# Altium PCB Saleem_PCB.PcbDoc (part 3 of 3)
Units mil, origin at the board's own origin, x right, y up, seen from the top; angles counter-clockwise.
Board outline 2705.54 x 1767 mil, 2 copper layers (Top Layer, Bottom Layer); 91 components, 66 nets, 321 pads, 111 vias.
Unrouted connection lines stored in the file: 1.
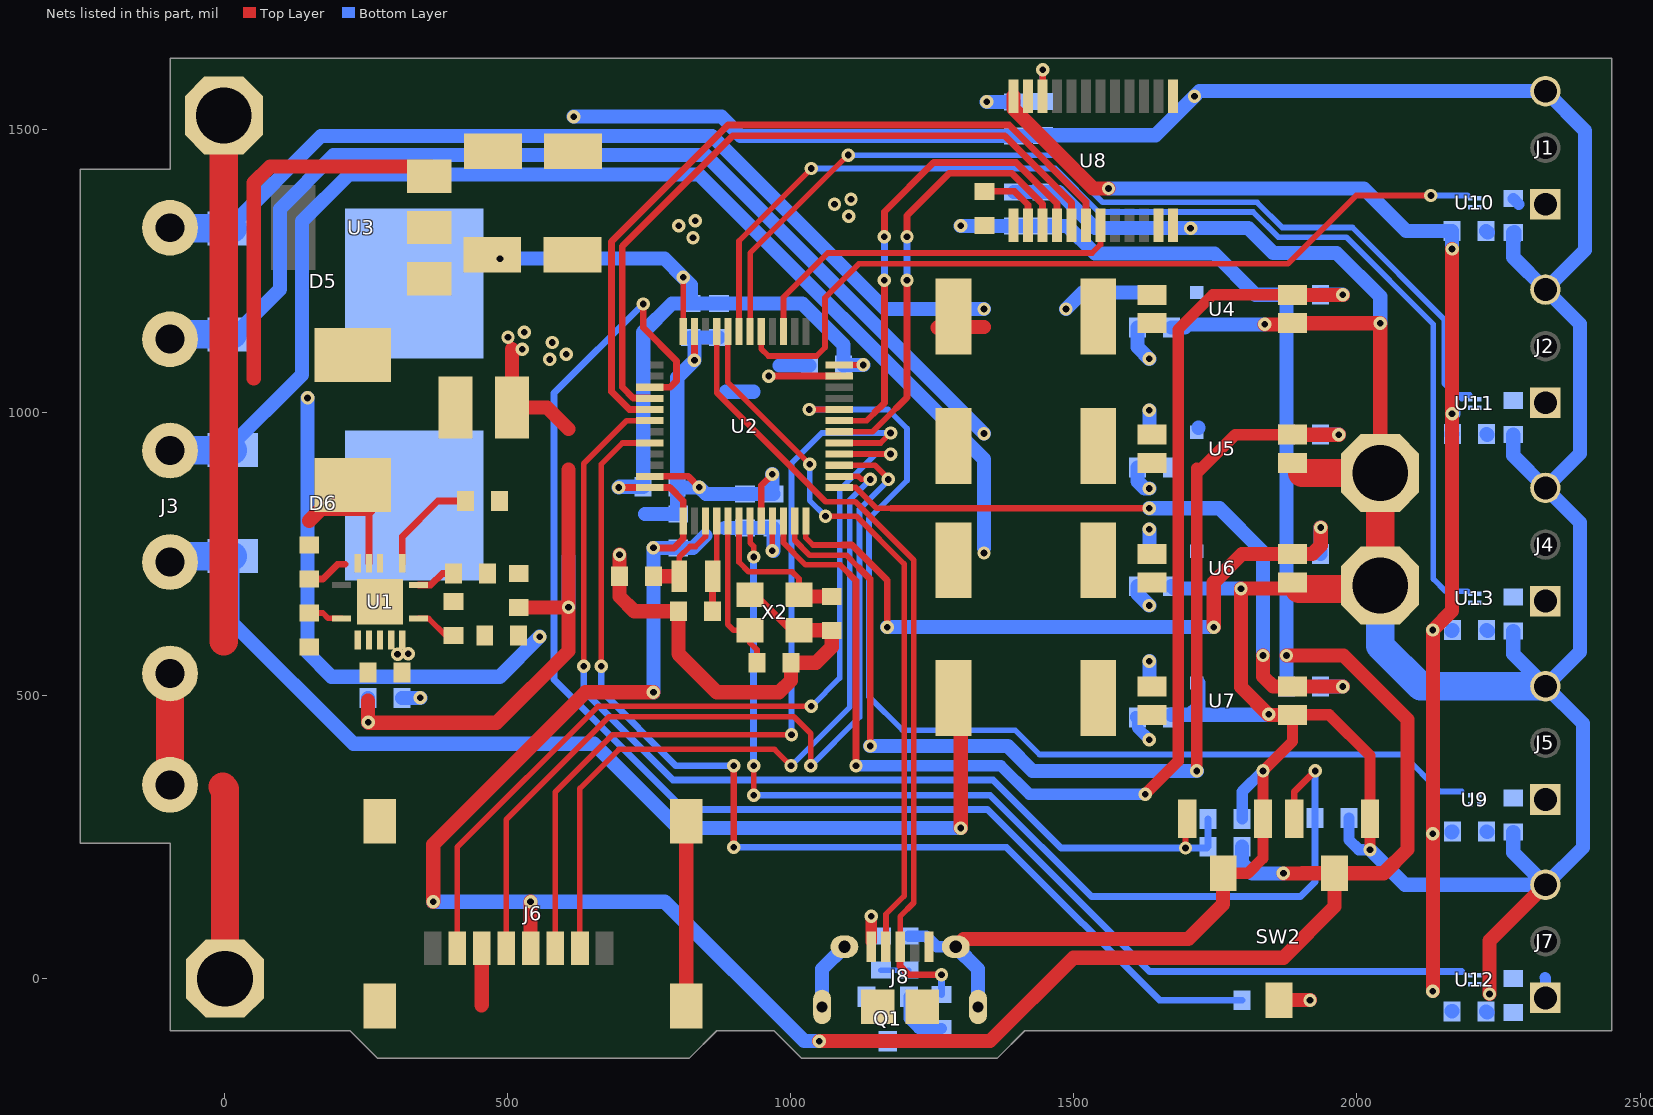
[diagram p2: the nets of this part, all layers, seen from the top]

## Via types
v1: diameter 23.62, hole 11.81, Top Layer to Bottom Layer, 111 vias

## Nets (pads, with @x,y where several pads share a name; then routed paths per layer and width w, separated by ;. In a path a pad name is that pad's centre, name@x,y a point inside that pad or via, vN(x,y) a via of type N, cw(c..) or ccw(c..) an arc to the next point about the centre after c; other vN are vias at no path point) (continued)
AN_1: D1.2 R7.1 U4.1 | length 185.1
  Top Layer w25: R7.1@1557.97,1150.27 R7.1@1557.97,1175.03
  Bottom Layer w25: v1(1486,1183) 1515.27,1212.27 D1.2@1634.17,1212.27
AN_2: D2.2 R12.1 U5.1 | length 38.5
  Bottom Layer w25: D2.2@1633.22,965.27 v1@1633.22,1003.78
  other v1: 1633,1004
AN_3: D3.2 R13.1 U6.1 | length 38.5
  Bottom Layer w25: D3.2@1633.22,755.27 v1@1633.22,793.78
  other v1: 1633,794
AN_4: D4.2 R14.1 U7.1 | length 38.5
  Bottom Layer w25: D4.2@1633.22,522.27 v1@1633.22,560.78
  other v1: 1633,561
BOOT0: R4.1 U2.44 | length 1944.7
  Top Layer w10: v1(665,552) 665,909 702.47,946.47 U2.44@750.68,946.47
  Top Layer w12: v1(899,232) v1(899,376)
  Bottom Layer w12: v1(665,552) 665,508 797,376 v1(899,376) ; v1(899,232) 1381,232 1651,-38 R4.1@1797,-38
BUTTON_1: D5.3 J3.1 R7.2 | length 1825.5
  Top Layer w25: R7.2@1259.05,1150.27 1259.32,1150 1260.32,1151 1341,1151
  Bottom Layer w25: J3.1@-97,1326.63 7.63,1326.63 170,1489 860.25,1489 1166.25,1183 v1(1341,1183)
  Bottom Layer w50: J3.1@-97,1326.63 -96.07,1325.7 D5.3@13.67,1325.7
BUTTON_2: D5.1 J3.2 R12.2 | length 1973.9
  Bottom Layer w25: J3.2@-97,1129.78 8.78,1129.78 97,1218 97,1360 192,1455 849,1455 v1(1341,963)
  Bottom Layer w50: J3.2@-97,1129.78 -88.48,1138.3 D5.1@13.67,1138.3
BUTTON_3: D6.3 J3.3 R13.2 | length 2275.1
  Bottom Layer w25: J3.3@-97,932.93 1.93,932.93 2.7,933.7 136,1067 136,1338 219,1421 837.75,1421 1341,917.75 v1@1341,761
  Bottom Layer w50: J3.3@-97,932.93 -96.22,933.7 2.7,933.7 D6.3@13.67,933.7
  other v1: 1341,752
BUTTON_4: D6.1 J3.4 R14.2 | length 1933.6
  Top Layer w25: v1(1300,266) R14.2@1300.05,530.27
  Bottom Layer w25: D6.1@13.67,746.3 13.67,628.33 227,415 652,415 801,266 v1(1300,266)
  Bottom Layer w50: J3.4@-97,736.07 -86.78,746.3 D6.1@13.67,746.3
Cath_1: R15.2 U4.2 | length 63.9
  Bottom Layer w25: R15.2@1612.3,1150.27 1612.3,1115.7 v1(1633,1095)
Cath_2: R16.2 U5.2 | length 50.5
  Bottom Layer w25: R16.2@1612.3,903.27 1612.3,878.7 1624.98,866.02 v1(1633,866.02)
Cath_3: R17.2 U6.2 | length 42.6
  Bottom Layer w25: R17.2@1612.3,693.27 1612.3,679.97 v1(1633,659.27)
Cath_4: R18.2 U7.2 | length 49.3
  Bottom Layer w20: R18.2@1609,461.27 R18.2@1609,463 ; R18.2@1612.3,461.27 1612.3,442.97 v1(1633,422.27)
GND: C1.2 C2.2 C3.2 C4.2 C6.2 C7.2 C8.2 C9.2 C10.2 C11.2 C12.2 C13.2 C14.2 C15.2 C16.2 C17.2 C18.2 C19.2 C20.1 C21.1 C22.1 C23.1 C24.2 C25.2 C26.2 C27.2 C28.2 C29.2 C30.2 C31.2 C32.2 C33.2 C34.2 D1.1 D2.1 D3.1 D4.1 J1.3 J2.3 J3.5 J3.6 J4.3 J5.3 J6.6 J6.MP1 J6.MP2 J6.MP3 J6.MP4 J7.3 J8.5 J8.MH1 J8.MH2 J8.MH3 J8.MH4 J8.MP1 J8.MP2 pad.MH R2.2 R5.2 R15.1 R16.1 R17.1 R18.1 R20.2 R21.2 SW1.2 SW2.3 SW3.2 U1.2 U1.3 U1.15 U2.8 U2.23 U2.35 U2.47 U3.1 U4.3 U5.3 U6.3 U7.3 U8.11 U8.12 U8.13 U9.2 U10.2 U11.2 U12.2 U13.2 X2.2 X2.4 | length 14261.8
  Top Layer w12: U2.47@750.68,887.42 818.58,887.42 v1(838,868) ; v1(829.42,1092.58) U2.35@829.42,1143.32 ; X2.4@935.69,679.5 X2.2@998.68,616.5 ; U2.8@947.53,808.68 947.53,871.53 v1(967,891) ; v1(961,1064.58) U2.23@1085.32,1064.58
  Top Layer w20: SW2.3@1763.57,186.2 1807.2,186.2 1833.93,212.93 SW3.2@1833.93,282.75 v1(1833.93,367) 1886.02,419.09 U7.3@1886.02,466 1951,466 2023,394 v1@2023,229 ; U6.3@1886.02,700 U6.3@1897.52,688.5 ; U5.3@1886.02,911 U5.3@1903.52,893.5
  Top Layer w25: 253,491 v1(253,453) 254,452 480,452 607,579 v1(607,656) ; 453,-47 453.77,-46.23 J6.6@453.77,54 ; 507,1112 C2.2@507,1009 569,1009 607,971 ; C3.2@519,656 v1(607,656) ; 607,899 v1(607,656) ; v1(697,749) C20.1@697,711 697,675 723,649 C21.1@801,649 801,574 869,506 979,506 1000,527 C22.1@1000,558 1044,558 1072,586 C23.1@1072,615 ; J6.MP1@814.99,-48.36 J6.MP3@814.99,278.41 ; X2.2@1014.31,615.5 C23.1@1071.5,615.5 ; J8.MH2@1291.22,56.3 1304.92,70 1702,70 1763.57,131.57 SW2.3@1763.57,186.2 ; v1(1837,1156) 1884,1156 U4.3@1885,1157 ; U7.3@1886.02,466 1844.02,466 1795,515.02 v1(1795,689) 1875.02,689 U6.3@1886.02,700 ; U4.3@1886.02,1158 v1(2041,1158) pad.MH@2041,922.5 ; v1(2234,-27) 2234,67 J7.3@2333,166
  Top Layer w50: J3.6@-97,342.37 J3.5@-97,539.22 ; -4,339 0,335 pad.MH@0,0 ; -2,596 pad.MH@-2,1525 ; U6.3@1897.52,688.5 pad.MH@2041,688.5 ; U5.3@1903.52,893.5 pad.MH@2041,893.5 pad.MH@2041,699.5
  Bottom Layer w20: R21.2@1208,75 1239,75 1257.7,56.3 J8.MH2@1291.22,56.3 ; D4.1@1718.8,522.27 1719.07,522 D4.1@1719.8,522 ; C34.2@1797,282.25 1797,330.07 v1(1833.93,367) ; C18.2@1986.02,283.75 1986.02,244.98 2003.05,227.95 v1@2022.05,227.95
  Bottom Layer w25: v1(253,453) C1.2@253,496 ; v1(607,656) 607,745 ; v1(616,1523) 877,1523 911,1489 C12.2@1394,1489 1444,1489 R20.2@1445,1490 1644,1490 v1(1713,1559) 1722,1568 J1.3@2333,1568 2403,1498 2403,1287.5 J2.3@2333,1217.5 ; 742,821 C6.2@801,821 799,823 C7.2@799,869 ; C15.2@873,1133 C13.2@823,1133 829.42,1126.58 v1(829.42,1092.58) 799,1062.17 C7.2@799,869 ; 885,1037 934,1037 ; v1(967,891) 967,858 C14.2@969,856 C16.2@919,856 850,856 v1(838,868) 800,868 C7.2@799,869 ; 980,1083 C17.2@1033,1083 ; J8.MH3@1055,-50 1055,16.93 J8.MH1@1094.37,56.3 ; J8.MH2@1291.22,56.3 1330.59,16.93 J8.MH4@1330.59,-50 ; C10.2@1394,1390 C11.2@1444,1390 1473.35,1390 1537.35,1326 v1(1706,1326) 1808,1326 1852,1282 1964,1282 2041,1205 v1(2041,1158) ; R18.1@1672.3,466.27 1705.27,466.27 ; R17.1@1672.3,693.27 1676.57,689 v1(1795,689) ; R15.1@1672.3,1150.27 1695.73,1150.27 ; 1710,1156 v1(1837,1156) ; D4.1@1718.8,522.27 D4.1@1719.8,522.27 ; D4.1@1719.8,522 1719.8,480.8 1705.27,466.27 ; v1(1844.02,466.98) 1843.31,466.27 1705.27,466.27 ; v1(2022.95,227.95) 2084.89,166 J7.3@2333,166 ; C32.2@2228,-58 C32.2@2230,-60 ; C24.2@2228,1321 C24.2@2231,1318 ; C30.2@2229,260 C30.2@2230,259 ; C28.2@2229,616 C28.2@2231,614 ; C26.2@2229,962 C26.2@2230,961 ; C31.2@2276,259 2276,223 J7.3@2333,166 ; C29.2@2276,614 2276,573.5 J5.3@2333,516.5 ; C27.2@2276,961 2276,924 J4.3@2333,867 ; C25.2@2276,1318 2276,1274.5 J2.3@2333,1217.5 ; C25.2@2278,1307 C25.2@2278,1319 ; J7.3@2333,166 2399,232 2399,450.5 J5.3@2333,516.5 ; J5.3@2333,516.5 2394,577.5 2394,806 J4.3@2333,867 ; J4.3@2333,867 2394,928 2394,1156.5 J2.3@2333,1217.5
  Bottom Layer w50: pad.MH@2041,694.5 2041,588 2112.5,516.5 J5.3@2333,516.5
  other v1: 574,1094 603,1103 525,1112 578,1124 500,1133 529,1142 827,1309 802,1330 831,1339 1102,1347 1077,1368 1106,1377
LED_EN1: U2.29 U10.4 | length 1452.8
  Top Layer w10: U2.29@947.53,1143.32 947.53,1112.47 960,1100 1045,1100 1060,1115 1060,1203 1120,1263 1878,1263 1998.6,1383.6 v1(2130.6,1383.6)
  Bottom Layer w10: v1(2130.6,1383.6) 2195.28,1383.6
LED_EN2: U2.30 U11.4 | length 1729.6
  Top Layer w10: U2.30@927.84,1143.32 927.84,1281.84 v1(1101,1455)
  Bottom Layer w10: v1(1101,1455) 1467.35,1455 1550.85,1371.5 1823.5,1371.5 1868,1327 1992,1327 2154,1165 2154,1052 2175,1031 2185.04,1031 ; 2185.04,1024.58 2185.04,1031 ; 2199,1031 2185.04,1031
LED_EN3: U2.31 U13.4 | length 2073
  Top Layer w10: U2.31@908.16,1143.32 908.16,1303.35 v1(1036,1431.19)
  Bottom Layer w10: v1(1036,1431.19) 1466.81,1431.19 1543.5,1354.5 1816.46,1354.5 1860.96,1310 1981,1310 2135,1156 2135,706 2156.53,684.47 2187.01,684.47 2195.28,684.47
LED_EN4: U2.20 U9.4 | length 1857.2
  Top Layer w10: v1(1032.53,1005.53) U2.20@1085.32,1005.53
  Bottom Layer w10: v1(1032.53,1005.53) 1171.47,1005.53 1205,972 1205,880 1138,813 1138,498 1197,439 1396,439 1439,396 2081,396 2146.31,330.69 2185.04,330.69
LED_EN5: U2.39 U12.4 | length 2758.3
  Top Layer w12: v1(739,1192) 739,1150 798,1091 798,1056 786.9,1044.9 U2.39@750.68,1044.9
  Bottom Layer w12: v1(739,1192) 581.5,1034.5 581.5,528.5 811,299 1347,299 1633.31,12.69 2185.04,12.69
LED_IN1: C25.1 J1.1 U10.1 | length 14.1
  Bottom Layer w20: C25.1@2276,1378 C25.1@2286,1368
LED_IN2: C27.1 J2.1 U11.1
LED_IN3: C29.1 J4.1 U13.1
LED_IN4: C31.1 J5.1 U9.1
LED_IN5: C33.1 J7.1 U12.1 | length 36.4
  Bottom Layer w20: 2332,2 2333,1 J7.1@2333,-34
MCU_IN1: R8.1 U2.10 U4.4 | length 2253.7
  Top Layer w10: U2.10@986.9,808.68 986.9,770.06 1025.96,731 1087,731 1103.5,714.5
  Top Layer w12: 1103.5,714.5 1115,703 v1(1115,376)
  Top Layer w20: v1(1626,326) 1684,384 1684,1147 1745,1208 U4.4@1886.02,1208
  Top Layer w25: U4.4@1886.02,1208 v1(1975,1208)
  Bottom Layer w20: v1(1115,376) 1371,376 1421,326 v1(1626,326)
  Bottom Layer w25: R8.1@1935.51,1208.27 v1@1974.73,1208.27
MCU_IN2: R9.1 U2.11 U5.4 | length 1932.9
  Top Layer w10: U2.11@1006.58,808.68 1006.58,774.42 1033,748 1098,748 1120.5,725.5
  Top Layer w12: 1120.5,725.5 1140,706 v1(1140,411)
  Top Layer w20: v1(1717,367) 1717,902 ; 1717,893 1785,961 U5.4@1886.02,961
  Top Layer w25: U5.4@1886.02,961 v1(1968,961)
  Bottom Layer w25: v1(1140,411) 1383,411 1427,367 v1(1717,367) ; R9.1@1935.51,961.27 v1@1968,961.27
MCU_IN3: R10.1 U2.12 U6.4 | length 1238.3
  Top Layer w10: U2.12@1026.27,808.68 1026.27,778.77 1039.04,766 1091,766
  Top Layer w12: 1091,766 1108,766 1170,704 v1(1170,621)
  Top Layer w25: v1(1747,621) 1747,700 1797,750 U6.4@1886.02,750 1921,750 1936,765 v1(1936,797)
  Bottom Layer w25: v1(1170,621) v1(1747,621) ; R10.1@1935.51,750.27 v1@1935.51,797
MCU_IN4: R11.1 U2.13 U7.4 | length 1201.8
  Top Layer w10: U2.13@1085.32,867.73 1114.34,867.73 1151.07,831 1177,831
  Top Layer w12: 1177,831 v1@1632,831
  Top Layer w25: v1(1834,571) 1834,534 1852,516 U7.4@1886.02,516 ; U7.4@1887.02,516 v1(1975,516)
  Bottom Layer w25: v1(1633,831) 1757,831 1834,754 v1(1834,571) ; R11.1@1935.51,516.27 1974.73,516.27 v1(1975,516)
NetC3_1: C3.1 R1.1
NetC4_1: C4.1 U1.9 | length 185
  Top Layer w12: U1.9@313.37,733.91 313.37,781.37 376,844 C4.1@425,844
NetC5_2: C5.2 U1.13 | length 73.8
  Top Layer w12: C5.2@149,706 173,706 199,732 212,732
NetQ1_1: Q1.1 R6.1 R21.1 | length 49
  Bottom Layer w10: R6.1@1159,15 R21.1@1208,15
NetQ1_2: Q1.2 R22.2 | length 103.7
  Bottom Layer w20: Q1.2@1208.4,-31.63 1208.4,-70.4 1226,-88 R22.2@1266,-88
NetR1_2: R1.2 U1.8 | length 70.6
  Top Layer w12: U1.8@341.91,695.53 363.53,695.53 384,716 R1.2@404,716
NetR2_1: R2.1 U1.1 | length 61
  Top Layer w10: R2.1@149,646 173,646 182.53,636.47 U1.1@206.09,636.47
NetR4_2: R4.2 SW2.2 | length 115.4
  Top Layer w25: SW2.2@1862,-37 1863,-38 v1(1917,-38)
  Bottom Layer w25: R4.2@1857,-38 v1(1917,-38)
NetR19_2: R19.2 U8.2 | length 123.1
  Top Layer w12: R19.2@1342,1391 1395.13,1391 1418.84,1367.29 U8.2@1418.84,1330.83
NetR20_1: R20.1 U8.22 | length 103.4
  Top Layer w12: U8.22@1445,1561 v1(1445,1606)
  Bottom Layer w12: v1(1445,1606) R20.1@1445,1550 1445,1549 R20.1@1446,1548
PB6: C34.1 R23.1 SW3.1 U2.42 | length 1871.4
  Top Layer w10: v1@634,553 634,910 709.84,985.84 U2.42@750.68,985.84 ; v1(1697,230.75) 1697,279.68 SW3.1@1700.07,282.75
  Bottom Layer w10: v1(634,552) v1@634,553 ; R23.1@1734.75,230.75 R23.1@1737,233
  Bottom Layer w12: v1(634,552) 634,508 791.25,350.75 1357.25,350.75 1477.25,230.75 v1(1697,230.75) R23.1@1734.75,230.75 ; R23.1@1737,233 C34.1@1737,282.25
PH: C5.1 L1.1 U1.11 U1.12 | length 210.2
  Top Layer w12: U1.12@254.32,733.91 L1.1@254.32,830.07
  Top Layer w25: 149,809 170.07,830.07 L1.1@254.32,830.07
PWM_1: U2.18 U8.3 | length 796.7
  Top Layer w10: U2.18@1085.32,966.16 1144.16,966.16 1186.5,1008.5
  Top Layer w12: 1186.5,1008.5 1205,1027 v1(1205,1234) ; v1(1205,1310.87) 1205,1348 1280,1423 1390,1423 1444.43,1368.57 U8.3@1444.43,1330.83
  Bottom Layer w12: v1(1205,1234) v1(1205,1310.87)
PWM_2: U2.19 U8.4 | length 840.5
  Top Layer w10: U2.19@1085.32,985.84 1133.84,985.84 1147,999
  Top Layer w12: 1147,999 1165,1017 v1(1165,1234) ; v1(1165,1310.87) 1165,1354.87 1252.13,1442 1397.87,1442 1470.02,1369.85 U8.4@1470.02,1330.83
  Bottom Layer w12: v1(1165,1234) v1(1165,1310.87)
PWM_3: U2.40 U8.5 | length 1269.5
  Top Layer w12: U2.40@750.68,1025.21 750.29,1025.6 721.28,1025.6 702,1044.88 702,1294 897,1489 1377.74,1489 1495.61,1371.13 U8.5@1495.61,1330.83
PWM_4: U2.41 U8.6 | length 1367
  Top Layer w12: U2.41@750.68,1005.53 714.48,1005.53 683,1037.01 683,1302 889,1508 1385.61,1508 1521.2,1372.41 U8.6@1521.2,1330.83
PWM_5: U2.27 U8.7 | length 693
  Top Layer w10: U2.27@986.9,1143.32 986.9,1203.9 1065,1282 1532,1282 1546.8,1296.8 U8.7@1546.8,1330.83
RST: C18.1 SW1.1 U2.7 | length 1864.3
  Top Layer w10: v1@927.84,746.16 v1@929,745 ; U2.7@927.84,808.68 927.84,770.16 934,764 v1(934,745) ; v1(934,324) v1(934,376) v1@934,379
  Top Layer w12: SW1.1@1889.09,282.75 1889.09,330.09 v1(1926,367)
  Bottom Layer w12: v1(934,324) 1352,324 1531,145 1900,145 1926,171 v1(1926,367) ; v1(934,376) v1(934,745)
SPI_CLK: J6.5 U2.15 | length 1570.6
  Top Layer w10: J6.5@497.08,54 497.08,281.08 679,463 1005,463 1035,433 v1(1035,376) ; U2.15@1085.32,907.1 1148.57,907.1 1172,883.67 v1(1172,882)
  Bottom Layer w10: v1(1035,376) 1121,462 1121,829.33 1172,880.33 v1(1172,882)
SPI_CS: J6.2 U2.14 | length 1316.5
  Top Layer w10: J6.2@627,54 627,336 696,405 971,405 v1(1000,376) ; U2.14@1085.32,887.42 1119,887.42 1124.42,882 v1(1140,882)
  Bottom Layer w10: v1(1000,376) 1104,480 1104,846 v1(1140,882)
SPI_MISO: J6.7 U2.16 | length 1516.8
  Top Layer w10: J6.7@410.46,54 410.46,232.46 659,481 v1(1036,481) ; U2.16@1085.32,926.79 v1(1176,926.79)
  Bottom Layer w10: v1(1036,481) 1086,531 1086,863 1149.79,926.79 v1(1176,926.79)
SPI_MOSI: J6.3 U2.17 | length 1509.7
  Top Layer w10: J6.3@583.69,54 583.69,329.69 685,431 v1(1001,431) ; U2.17@1085.32,946.47 1158.47,946.47 v1(1176,964)
  Bottom Layer w10: v1(1001,431) 1001,910.67 1054.33,964 v1(1176,964)
USB_DM: J8.2 U2.32 | length 1261.6
  Top Layer w10: U2.32@888.47,1143.32 888.47,1053.53 v1(1033,909) ; v1(1061,817) 1115.57,817 1200,732.57 1200,146 1168,114 1168,57.09 J8.2@1167.2,56.3
  Bottom Layer w10: v1(1033,909) 1033,845 v1(1061,817)
USB_DP: J8.3 R22.1 U2.33 | length 1420.7
  Top Layer w10: 868.79,1074.11 868.79,1035.21 1061.5,842.5 1114.11,842.5 1217,739.61 1217,134 1192.8,109.8 J8.3@1192.8,56.3 ; 868.81,1074.14 U2.33@868.79,1143.32
  Top Layer w12: J8.3@1192.8,56.3 1192.8,22.2 1208,7 v1(1266,7)
  Bottom Layer w12: R22.1@1266,-28 v1(1266,7)
VBAT: C1.1 C19.1 D5.4 D6.4 U1.4 U1.5 U1.6 | length 32
  Bottom Layer w25: C1.1@313,496 v1(345,496)
  other v1: 305,573 324,574
VBUS_5V: J8.1 R6.2 | length 44.7
  Top Layer w20: J8.1@1141.61,65.3 v1(1141.61,110)
VCC_3V3: C6.1 C7.1 C9.1 C10.1 C11.1 C13.1 C14.1 C15.1 C16.1 C17.1 J6.4 Q1.3 R8.2 R9.2 R10.2 R11.2 R19.1 R23.2 SW2.1 U2.1 U2.9 U2.24 U2.36 U2.48 U3.2 U8.1 | length 6916.4
  Top Layer w10: U2.36@809.73,1143.32 v1(809.73,1239) ; v1@967.21,756 U2.9@967.21,808.68 ; U2.24@1085.32,1084.27 v1(1127.73,1084.27)
  Top Layer w12: v1(695.73,867.73) U2.48@750.68,867.73 786.02,867.73 809.73,844.02 U2.1@809.73,808.68 809.73,777.73 793,761 v1(757,761)
  Top Layer w25: v1(368,136) 368,237 637,506 v1(757,506) ; v1(540,136) 540,54.39 J6.4@540.39,54 ; v1(1050,-110.37) 1351.63,-110.37 1499,37 1870,37 1960.43,127.43 SW2.1@1960.43,186.2 ; v1(1870,186) 1903,186 1903.2,186.2 SW2.1@1960.43,186.2 ; v1(1875.51,571) 1976,571 2089,458 2089,228 2047.2,186.2 SW2.1@1960.43,186.2
  Bottom Layer w25: v1(368,136) v1(540,136) 777,136 1023.37,-110.37 v1(1050,-110.37) Q1.3@1171,-110.37 ; v1(486,1272) 776.73,1272 v1(809.73,1239) 823,1225.73 C13.1@823,1193 ; v1(695.73,867.73) 697,869 C7.1@739,869 739,1142 790,1193 C13.1@823,1193 ; v1(757,506) v1(757,761) C6.1@801,761 827,761 849,783 ; 883,796 C16.1@919,796 C14.1@969,796 v1@969,756 ; v1(1127.73,1084.27) 1094.27,1084.27 C17.1@1093,1083 1093,1120 1020,1193 C15.1@873,1193 C13.1@823,1193 ; v1(1300,1330) C10.1@1394,1330 C11.1@1444,1330 1488.1,1330 1537.1,1281 1748,1281 1820.73,1208.27 R8.2@1875.51,1208.27 R9.2@1875.51,961.27 R10.2@1875.51,750.27 v1(1875.51,571) R11.2@1875.51,516.27 ; R23.2@1797,233 1797,204 1815,186 v1(1870,186)
  other v1: 967,756
VDD_5V: C2.1 C8.1 C12.1 C24.1 C26.1 C28.1 C30.1 C32.1 L1.2 R3.2 U3.3 U8.23 U8.24 U9.3 U10.3 U11.3 U12.3 U13.3 | length 3883.8
  Top Layer w25: 51,1060 51,1406 80,1435 U3.3@363,1435 ; U8.24@1393.25,1559.17 1393.25,1536.75 1534,1396 v1(1561,1396) ; v1(2134,-22) v1(2134,256) v1(2134,616) 2168,650 v1(2168,998) v1(2168,1289)
  Bottom Layer w25: v1(146,1026) 146,576 188.5,533.5 485.5,533.5 v1(556,604) ; v1(1346,1549) C12.1@1394,1549 ; v1(1561,1396) 2012,1396 2087,1321 C24.1@2168,1321 ; C32.1@2167.51,-57 2169,-57 C32.1@2168,-58 ; C30.1@2167.51,258.51 C30.1@2169,260 C30.1@2167.51,260 ; C28.1@2167.51,614.51 C28.1@2169,616 ; C26.1@2167.51,960.51 C26.1@2169,962 2168,963 C26.1@2167.51,963 ; C24.1@2167.51,1320.51 C24.1@2168,1321 ; v1(2168,1289) C24.1@2168,1321 ; v1@2170,998 v1@2170,1000
VSENSE: R3.1 R5.1 U1.7 | length 74.7
  Top Layer w10: U1.7@341.91,636.47 359.53,636.47 390,606 R5.1@404,606
X32_IN: C20.2 U2.3 X1.1 | length 168.3
  Top Layer w10: X1.1@802.47,711 802.47,744.47 821.49,763.49 831.51,763.49 849.1,781.08 U2.3@849.1,808.68
  Top Layer w25: C20.2@757,711 X1.1@802.47,711
X32_OUT: C21.2 U2.4 X1.2 | length 159.8
  Top Layer w10: X1.2@861.53,701 X1.2@861.79,701.26 ; X1.2@868.79,701.26 U2.4@868.79,808.68
  Top Layer w12: C21.2@861.53,649 X1.2@861.53,701
XIN: C22.2 U2.5 X2.1 | length 289.4
  Top Layer w10: U2.5@888.47,808.68 888.19,808.39 888.19,625.81 898.5,615.5 X2.1@927.69,615.5 927.69,593.31 940,581 C22.2@940,558
XOUT: C23.2 U2.6 X2.3 | length 268.4
  Top Layer w10: U2.6@908.16,808.68 908.16,735.84 925,719 1002,719 1014.31,706.69 X2.3@1014.31,678.5
  Top Layer w25: X2.3@1024.31,678.5 1027.8,675 C23.2@1072,675
pads on no net: J6.1 J6.8 J8.4 U1.10 U1.14 U2.2 U2.21 U2.22 U2.25 U2.26 U2.28 U2.34 U2.37 U2.38 U2.43 U2.45 U2.46 U3.4 U8.8 U8.9 U8.10 U8.14 U8.15 U8.16

## Polygon pours and split planes (outlines as drawn)
GND on Top Layer "GND_L01_P000" (hatched 45Degree grid 20 track 8, remove dead copper, pour order 0): -76,1591 2422,1591 2422,-68 1409,-68 1356,-121 1025,-121 972,-68 868,-68 815,-121 285,-121 238,-74 -76,-74 -76,267 -227,267 -227,1406 -76,1406
GND on Bottom Layer "GND_L02_P002" (hatched 45Degree grid 20 track 8, remove dead copper, pour order 2): -76,1599 2417,1599 2417,-60 1404,-60 1351,-113 1020,-113 967,-60 863,-60 810,-113 276,-113 229,-66 -72,-66 -72,267 -232,267 -232,1406 -76,1406

## Other copper
Top Layer:
  rectangle net AN_4: 1473,508.95 1663,574
  rectangle net BUTTON_4: 1243.05,418 1355.05,573
  rectangle net BUTTON_3: 1243.05,661 1355.05,816
  rectangle net AN_4: 1473,423 1582,571
  rectangle net AN_3: 1473,666 1582,814
  rectangle net AN_2: 1473,868 1582,1016
  rectangle net BUTTON_2: 1246,863 1358,1018
  rectangle net AN_1: 1473,1097 1582,1245
  rectangle net GND: 242,-89 848,2
  region net GND: 273,-89 273,564 237,564 237,-89
  region net GND: 402,1266 264,1266 264,1201 402,1201
  region net VBAT: 361,475 361,615 291,615 291,475
  region net PH: 183,800 37,800 37,751 183,751
  rectangle net GND: -152,240 260,603
  rectangle net GND: 830,-80 1350.28,-19
  rectangle net GND: 386,639 538,685
  rectangle net Cath_2: 1612.02,852 1664.02,929
  rectangle net PH: 126,751 174,845
  rectangle net PH: 37,789 300,925
  region net GND: 562,1166 562,1214 264,1214 264,1166
  region net VCC_3V3: 523,1274 523,1361 263,1361 263,1274
  region net VDD_5V: 694,1547 694,1607 513,1607 513,1547
  region net VDD_5V: 525,1370 525,1607 262,1607 262,1370
  region net VDD_5V: 1424,1527 1424,1607 679,1607 679,1527
  rectangle net GND: 550,971 668,1532
  rectangle net GND: 466,808 620,1214
  rectangle net VDD_5V: 37,952 437,1156
  rectangle net BUTTON_1: 1246,1092 1358,1247
  rectangle net Cath_3: 1612,645 1664,717
  rectangle net AN_4: 1612.56,515.44 1663.56,573.44
  rectangle net AN_3: 1511,748.22 1663.78,806.22
  rectangle net AN_2: 1613,958 1664,1016
  rectangle net AN_1: 1473,1184 1664,1244
  rectangle net AN_2: 1538,937 1664,1016
  rectangle net AN_3: 1538,726 1664,786
  rectangle net GND: 1856,659 1954,722
  rectangle net GND: 1858,864 1956,930
  rectangle net GND: 1234,31 1324,92
  rectangle net VDD_5V: 504,583 571,625
  rectangle net NetC5_2: 208,716 241,753
  rectangle net PH: 248,717 280,811
  rectangle net GND: 233,582 260,707
  rectangle net NetC3_1: 449,696.91 536.63,735
  rectangle net VSENSE: 381,586.91 473.63,625
  rectangle net VBAT: 269,579 336,615
  rectangle net GND: 228,473 261,626
  rectangle net Cath_1: 1612.02,1081 1664.02,1174.98
  rectangle net Cath_4: 1612,409 1664,483
  region net GND: 1719,1360.48 1639.66,1360.48 1639.66,1300.48 1719,1300.48
  region net GND: 1726,1588.83 1665.25,1588.83 1665.25,1528.83 1726,1528.83
  rectangle net VCC_3V3: 1286,1301 1400,1361
Bottom Layer:
  region net GND: 2212,667.58 2212,600 2245,600 2245,667.58
  region net GND: 2212,1012.58 2212,945 2245,945 2245,1012.58
  rectangle net NetQ1_1: 1116,-52 1153,10
  rectangle net NetQ1_1: 1116,-4 1226,34
  region net GND: 595,843 595,711 724,711 724,843
  region net GND: 820,843 599,843 599,804 820,804
  region net VCC_3V3: 911,792 745,792 745,716 911,716
  region net VCC_3V3: 987,815 836,815 836,769 987,769
  region net GND: 987,1148 784,1148 784,823 987,823
  rectangle net GND: 1657,437 1758,535
  rectangle net GND: 1657,670 1760,792
  rectangle net GND: 1657,884 1733,1225
  rectangle net VBUS_5V: 1128,67 1178,123
  rectangle net VCC_3V3: 953,743 983,811
  rectangle net GND: 2212,-77 2294,-45
  rectangle net GND: 2213,240 2299,274
  rectangle net GND: 2212,595 2299,629
  rectangle net GND: 2218,942 2299,976
  rectangle net GND: 2213,1301 2297,1333
  rectangle net LED_EN1: 2153,1374.54 2204.33,1391.87
  rectangle net LED_EN2: 2173.99,1019.67 2204.33,1036.99
  rectangle net LED_EN4: 2168,319.67 2204.33,336.99
  rectangle net LED_EN3: 2168,675.42 2204.33,692.74
  rectangle net LED_EN5: 2153,2 2204.33,18.99
  rectangle net GND: 785,1023 897,1148
  rectangle net VBAT: 211,553 457,1359
  rectangle net BUTTON_1: -153,1265.55 63,1386.55
  rectangle net BUTTON_2: -153,1068.7 63.78,1189.7
  rectangle net BUTTON_3: -153,871.85 63,992.85
  rectangle net BUTTON_4: -153,675 63,796
  rectangle net LED_IN5: 2212.41,2.13 2363,18.99
  rectangle net LED_IN4: 2212.41,320.13 2359,340
  rectangle net LED_IN1: 2212.41,1375 2359,1394
  rectangle net LED_IN2: 2212.41,1020.13 2359,1036.99
  rectangle net LED_IN3: 2212.41,675.87 2359,692.74
  rectangle net LED_IN5: 2257,-27 2364,17
  rectangle net LED_IN4: 2257,292 2359,340
  rectangle net LED_IN3: 2257,640 2359,688
  rectangle net LED_IN2: 2257,989 2359,1037
  rectangle net LED_IN1: 2257,1345 2359,1393
  region net GND: 2211.87,312.58 2211.87,243 2245,243 2245,312.58
  region net GND: 2211.87,-5.42 2211.87,-75 2247,-75 2247,-5.42
  region net VDD_5V: 2204.33,-5.87 2153,-5.87 2153,-22.74 2204.33,-22.74
  region net VDD_5V: 2204.33,312.13 2154,312.13 2154,295.26 2204.33,295.26
  region net VDD_5V: 2204.33,667.87 2154,667.87 2154,651.01 2204.33,651.01
  region net VDD_5V: 2203.58,1012.13 2154,1012.13 2154,995.26 2203.58,995.26
  region net VDD_5V: 2183,-76 2183,-5.87 2120,-5.87 2120,-76
  region net VDD_5V: 2184,239 2184,312.13 2120,312.13 2120,239
  region net VDD_5V: 2184,598 2184,667.87 2121,667.87 2121,598
  region net VDD_5V: 2184,952.94 2184,1008 2154,1008 2154,952.94
  region net VDD_5V: 2183,1311.94 2183,1367 2153,1367 2153,1311.94
  region net VDD_5V: 2204.33,1367 2153,1367 2153,1350.13 2204.33,1350.13
  region net GND: 2213,1367.46 2213,1303 2243,1303 2243,1367.46

## Silkscreen, mask and mechanical layers (free items; w line width, h text height)
Top Overlay:
  lines w10: 233,496 247,510
  text "# 0603 0.1uF" at 90,1548 h60
  text "String One" at 2209,1316 h60 r90
  text "String Two" at 2209,966 h60 r90
  text "#" at 125,741 h60 r180
  text "String Three" at 2209,614 h55.12 r90
  text "String Four" at 2209,264 h60 r90
  text "GND" at 174,240 h75 r90
  text "TEST" at 1684,209 h60 r90
  text "RST" at 2098,209 h60 r90
  text "SD IN" at 827,32 h60
  text "PROG" at 2088,-1 h60 r90
  text "APP" at 1685,-13 h60 r90
  text "String Five" at 2209,-86 h60 r90
Bottom Overlay:
  drawing of 3080 lines, arcs and shapes, not listed
  text "# 0603 0.1uF" at 458,1548 h60
  text "#" at 1325,1523 h60 r180
  text "#" at 2254,1456 h60 r180
  text "#" at 1325,1363 h60 r180
  text "#" at 754,1214 h60 r180
  text "#" at 2253,1099 h60 r180
  text "#" at 774,950 h60 r180
  text "#" at 993,830 h60 r180
  text "#" at 825,796 h60 r180
  text "#" at 2254,753 h60 r180
  text "#" at 2254,398 h60 r180
  text "#" at 1964,363 h60 r180
  text "#" at 1777,362 h60 r180
  text "#" at 2252,79 h60 r180
  text "ZERO CARBON FOOTPRINT" at 931,74 h38
Mechanical 2:
  the board outline again, w10

## Dimensions
2450,1626 to 2450,-92 on Mechanical 1
2450,1626 to -97,1626 on Mechanical 1

## Text inside footprints (layer, text, board x,y; h text height)
J6: Top Overlay "Board Edge" at 360.31,-21.5 h31.5
J8: Top Overlay "Board Edge" at 1099.37,-119.74 h19.68